# Altium PCB PCB1.PcbDoc (part 2 of 3)
Units mm, origin at the board's own origin, x right, y up, seen from the top; angles counter-clockwise.
Board outline 161.54 x 169.48 mm, 4 copper layers (Top Layer, Layer 1, Layer 2, Bottom Layer), stack 0.603 mm thick; 181 components, 244 nets, 1695 pads, 188 vias.
Unrouted connection lines stored in the file: 630.
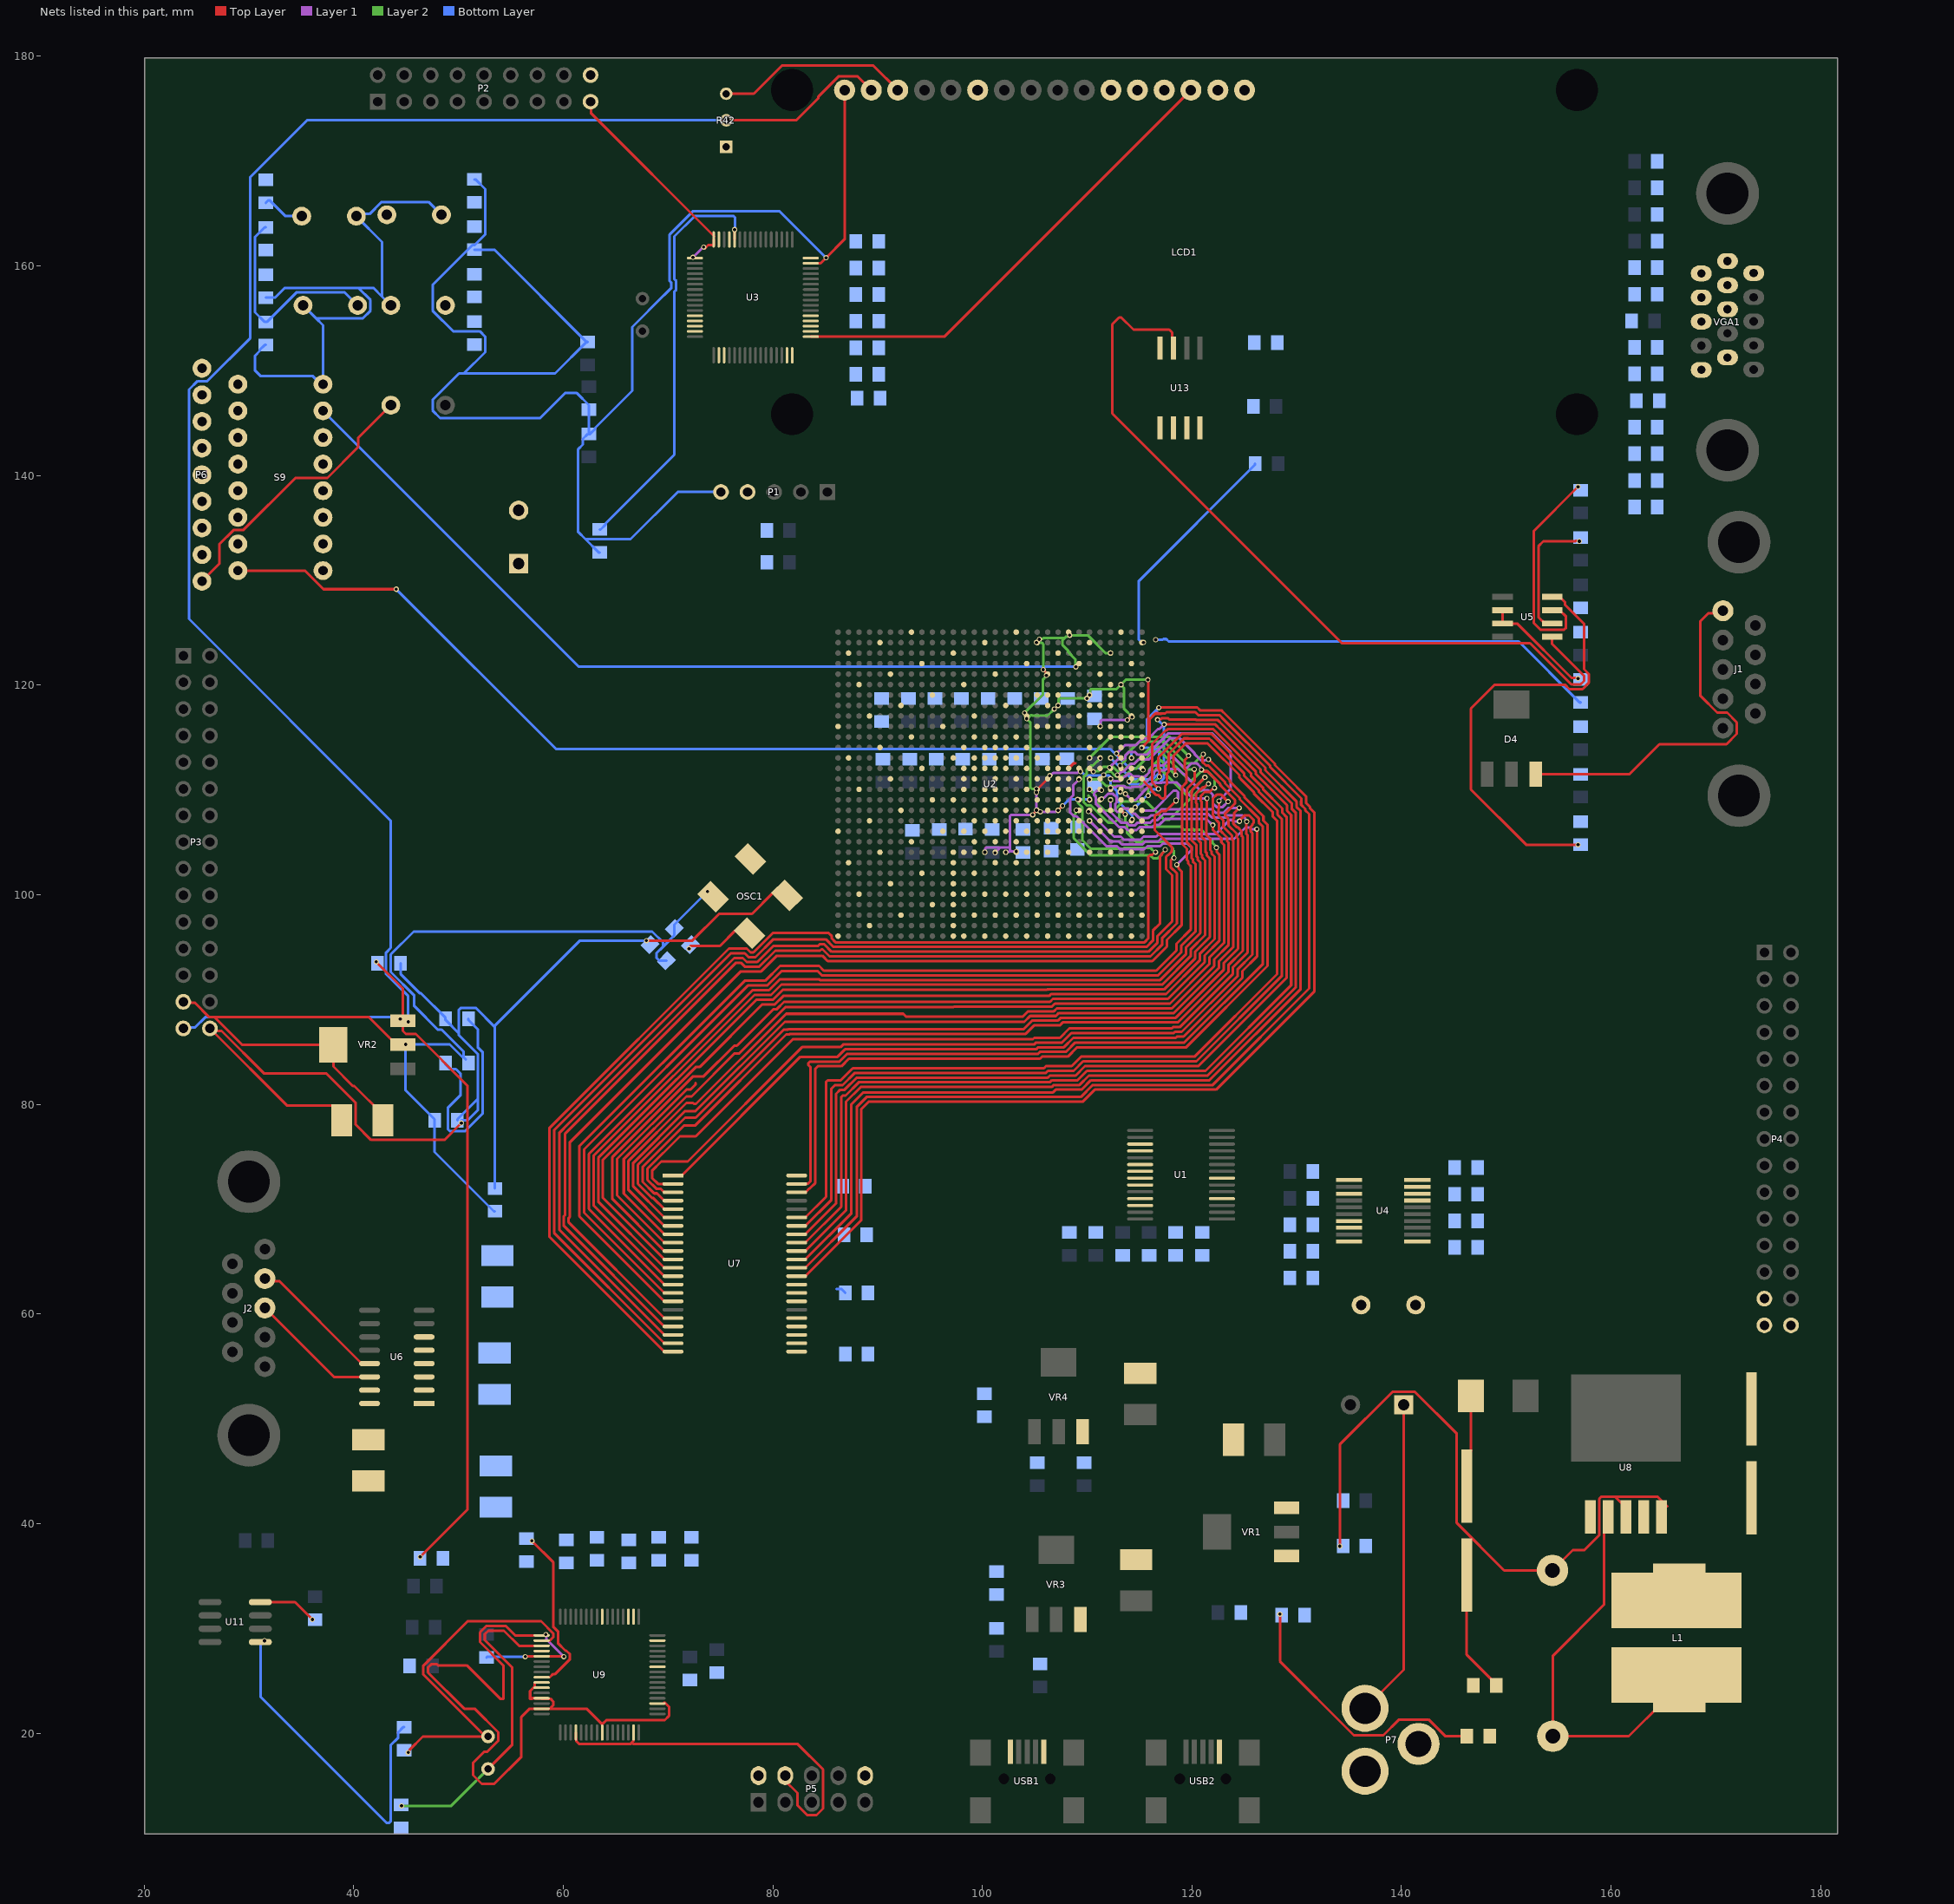
[diagram p4: the nets of this part, all layers, seen from the top]

## Via types
v1: diameter 0.5, hole 0.3, Top Layer to Bottom Layer, 94 vias
v2: diameter 0.5, hole 0.3, Top Layer to Layer 2, 55 vias
v3: diameter 0.5, hole 0.3, Top Layer to Layer 1, 39 vias

## Nets (pads, with @x,y where several pads share a name; then routed paths per layer and width w, separated by ;. In a path a pad name is that pad's centre, name@x,y a point inside that pad or via, vN(x,y) a via of type N, cw(c..) or ccw(c..) an arc to the next point about the centre after c; other vN are vias at no path point) (continued)
3V3: C2.1 C8.2 C13.2 C14.2 C16.2 C17.1 C19.2 C20.2 C21.2 C22.2 C23.2 C24.2 C25.2 C26.2 C28.2 C30.2 C34.2 C35.2 C36.1 C37.1 C47.1 C56.2 D2.1 F1.1 F3.2 F4.1 OSC1.4 P1.4 P2.17 P3.27 P4.27 P5.4 R20.2 R21.2 R25.1 R26.1 R28.1 R31.1 R35.2 R36.2 R37.2 R45.2 R50.2 S1.2 S2.2 S3.2 S4.2 S5.1 S9.9 S9.10 S9.11 S9.12 S9.13 S9.14 S9.15 S9.16 U2.AA16 U2.AA26 U2.AB13 U2.AB23 U2.AC30 U2.AD17 U2.AD27 U2.AE14 U2.AE24 U2.AF21 U2.AG18 U2.AG28 U2.AH15 U2.AH25 U2.AJ12 U2.AJ22 U2.AK19 U2.AK29 U2.R9 U2.T9 U2.U9 U2.V9 U2.W22 U2.Y13 U2.Y15 U2.Y29 U3.1 U3.19 U3.32 U3.48 U3.64 U4.18 U4.19 U4.20 U6.16 U7.11 U7.33 U9.20 U9.31 U9.42 U9.50 U9.56 U13.8 VR2.2 | length 684.6
  Top Layer w0.25: P3.27@23.749,89.789 23.854,89.684 24.874,89.684 26.234,88.324 26.734,88.324 ; C2.1@42.799,78.486 42.799,79.036 40.072,81.763 39.927,81.763 38.075,83.616 VR2.2@38.075,85.691 29.367,85.691 26.734,88.324 ; VR2.2@44.704,85.691 44.104,85.691 41.471,88.324 26.734,88.324 ; U9.20@61.222,20.071 61.222,19.421 61.272,19.371 61.272,19.234 61.536,18.971 66.408,18.971 66.565,19.128 ; P2.17@62.611,175.673 62.671,175.613 62.671,174.548 U3.64@74.405,162.814 ; U9.31@66.722,20.071 66.722,19.284 66.565,19.128 ; U7.11@70.485,65.214 69.66,65.214 63.798,71.076 63.798,74.716 72.648,83.566 73.025,83.566 79.007,89.548 80.206,89.548 81.004,90.345 106.378,90.345 106.555,90.522 117.528,90.522 120.773,93.767 120.773,94.404 122.16,95.791 122.16,103.648 121.886,103.922 121.886,104.141 121.761,104.266 121.761,105.325 121.365,105.721 121.365,107.371 121.415,107.421 121.415,109.171 v3(121.432,109.187) ; v3(73.406,161.798) 73.406,161.755 v3@73.494,161.667 ; v3@73.515,161.689 73.83,162.004 74.355,162.004 U3.64@74.355,162.529 ; P5.4@81.186,15.958 81.186,15.471 82.353,14.304 82.353,13.121 83.281,12.193 84.171,12.193 84.801,12.822 84.801,16.553 82.383,18.971 66.722,18.971 66.565,19.128 ; U7.33@83.11,64.414 88.011,69.315 88.011,79.756 88.958,80.703 109.392,80.703 110.546,81.857 121.989,81.857 131.191,91.059 131.191,107.695 130.821,108.065 130.821,108.192 130.424,108.589 130.424,108.962 130.452,108.99 130.452,109.197 127.461,112.188 127.461,112.318 123.066,116.713 123.063,116.713 122.624,117.152 120.591,117.152 120.319,117.424 117.584,117.424 117.459,117.299 117.096,117.299 117.08,117.282 116.481,117.282 115.955,116.756 115.955,114.784 115.823,114.652 ; v2(104.031,117.356) 104.031,117.31 U2.W22@104.233,117.108 ; v3(104.808,107.637) 105.156,107.985 v3(105.156,108.077) ; v2(105.156,110.109) 105.28,110.109 U2.AA16@106.233,111.062 106.233,111.121 106.427,111.315 v3(106.427,111.374) ; v2(105.808,121.487) U2.AA26@106.16,121.135 ; v3(107.233,108.062) v1(107.658,108.486) ; v2(112.233,123.062) U2.AG28@112.282,123.062 ; v3(113.658,109.637) 113.665,109.63 v3@113.665,109.474 ; v3(113.84,116.683) 113.847,116.683 U2.AJ22@114.138,116.974 ; v1(115.197,114.026) U2.AK19@115.233,114.062 115.823,114.652 ; v2@115.823,120.514 115.823,114.652
  Layer 1 w0.25: v3(72.39,160.829) 72.413,160.829 73.383,161.798 v3(73.406,161.798) ; v3(100.233,104.062) 100.281,104.11 100.281,104.422 100.379,104.521 101.727,104.521 ; v3(101.219,104.013) 101.727,104.521 ; v3(102.233,104.062) 102.281,104.11 102.586,104.11 102.689,104.213 ; v3(103.251,104.14) 102.762,104.14 102.689,104.213 ; v3(104.808,107.637) 102.762,107.637 102.616,107.49 102.616,104.521 ; v3(105.156,108.077) v3(105.156,109.773) ; v3(105.531,107.924) 107.027,107.924 107.165,108.062 v3(107.233,108.062) ; v3(106.427,111.374) 106.495,111.374 106.754,111.633 109.074,111.633 v1@109.172,111.732 ; v3(111.252,116.078) 111.3,116.126 111.3,116.585 111.398,116.683 v3(113.84,116.683) ; v3(113.658,109.637) 114.261,109.034 114.612,109.034 115.246,109.668 115.246,109.707 116.251,110.711 116.638,110.711 116.659,110.689 117.136,110.689 117.158,110.711 118.564,110.711 120.064,109.211 121.408,109.211 v3(121.432,109.187) ; 101.727,104.521 102.616,104.521 ; 102.616,104.521 102.616,104.286 102.689,104.213
  Layer 2 w0.25: v2(104.031,117.356) 105.791,119.116 105.791,120.552 106.11,120.871 v2(106.11,120.939) ; v2(105.156,110.109) 104.732,110.109 104.585,110.255 104.585,116.459 v2(104.235,116.81) 104.302,116.81 104.611,117.119 104.75,117.119 104.768,117.101 106.238,117.101 v2(106.866,117.729) ; v2(105.156,124.079) 105.204,124.031 105.709,124.031 105.808,123.933 v2(105.808,121.487) ; v2(105.433,124.376) 105.481,124.423 105.751,124.423 105.814,124.487 107.845,124.487 ; v2(107.233,118.062) 107.276,118.105 107.276,118.687 107.334,118.745 v2(109.982,118.745) ; v2(108.337,124.769) 108.269,124.769 108.137,124.637 107.995,124.637 107.845,124.487 ; v2@108.404,124.769 110.054,124.769 111.76,123.063 v2(112.233,123.062) v2(112.233,123.062) ; v1@108.901,121.778 108.901,122.442 108.195,123.148 108.195,123.327 108.155,123.327 107.658,123.824 107.658,124.3 107.845,124.487 ; 110.111,109.478 110.188,109.401 110.188,109.141 v1(110.236,109.093) ; v2(110.233,119.062) 110.281,119.11 110.281,119.538 110.379,119.637 112.808,119.637 v2(113.233,120.062) ; v2(114.3,116.967) 113.538,117.729 113.538,119.709 113.233,120.014 v2(113.233,120.062) ; v2(115.796,120.514) 113.685,120.514 v2(113.233,120.062)
  Bottom Layer w0.25: C20.2@31.623,152.467 31.523,152.467 31.048,151.992 31.048,151.892 30.607,151.451 30.607,150.006 31.103,149.51 36.074,149.51 36.867,148.717 S9.16@37.084,148.717 37.084,154.337 36.404,155.017 ; C21.2@31.623,156.985 32.522,156.985 33.454,157.917 40.443,157.917 ; S2.2@35.179,156.242 36.404,155.017 ; S9.15@37.084,146.177 61.508,121.753 v1(108.926,121.753) ; S1.2@43.561,156.242 42.724,157.079 ; S4.2@48.387,164.878 47.162,166.103 42.673,166.103 41.534,164.964 40.472,164.964 S3.2@40.259,164.751 42.724,162.286 42.724,157.079 ; D2.1@50.715,84.284 D2.1@50.477,84.522 ; C47.1@53.492,69.806 53.392,69.806 47.727,75.471 C8.2@47.727,78.486 47.727,78.586 44.958,81.355 v1(44.958,85.725) 49.174,85.725 50.377,84.522 D2.1@50.477,84.522 ; C56.2@69.842,93.698 69.206,93.698 68.892,94.012 68.892,94.42 69.542,95.07 ; v1(73.787,100.33) 70.612,97.155 R50.2@70.612,96.774 70.612,96.14 69.542,95.07 ; 86.09,62.373 86.579,62.373 C35.2@86.919,62.033 ; v1(107.658,108.486) 108.264,109.093 v1(110.236,109.093) ; v1(109.373,111.763) 109.441,111.763 109.825,111.379 112.087,111.379 112.233,111.233 112.233,110.525 112.84,109.918 112.84,109.029 114.3,107.569 v1(114.3,107.188) ; v1(112.242,113.056) 114.3,110.998 116.251,110.998 116.878,111.626 116.878,113.782 116.732,113.928 115.947,113.928 115.849,114.026 v1(115.197,114.026) ; v1(115.385,124.079) 115.189,124.079 114.935,124.333 114.935,129.954 126.035,141.054 R35.2@126.035,141.154 ; v1(116.535,124.333) 117.218,124.333 117.285,124.4 117.542,124.4 117.776,124.166 151.191,124.166 156.999,118.358 R37.2@157.099,118.358 ; 36.404,155.017 40.893,155.017 41.611,155.734 41.611,156.749 40.443,157.917 ; 40.443,157.917 41.886,157.917 42.724,157.079 ; D2.1@50.477,84.522 50.477,85.058 48.397,87.138 48.033,87.138 45.792,89.38 45.792,90.396 43.55,92.637 43.55,94.307 45.73,96.487 68.503,96.487 69.542,95.448 69.542,95.07
  other v1: 113.157,109.834
  other v2: 114.3,107.188
3V3A: C27.1 F1.2 U3.13
5: C31.2 U5.8 | length 42.8
  Top Layer w0.25: U5.8@154.381,128.429 155.092,128.429 155.6,127.922 155.6,127.67 157.42,125.85 157.42,121.525 157.87,121.075 157.87,120.225 157.27,119.625 156.021,119.625 155.627,120.019 148.863,120.019 146.616,117.772 146.616,110.05 151.891,104.775 v1(156.845,104.775)
5V0: C5.2 C7.2 C9.2 C11.2 C53.1 D9.1 F5.2 LCD1.2 LCD1.15 P3.29 P4.29 R42.2 R48.2 R49.1 R51.1 U1.4 U1.20 U11.8 VR1.3 VR2.3 VR3.3 VR4.3 | length 272.7
  Top Layer w0.25: U11.8@31.102,32.517 34.412,32.517 v1(36.068,30.861) ; v1(42.164,93.599) 44.704,91.059 VR2.3@44.704,87.99 44.704,87.015 44.999,86.72 45.934,86.72 50.867,81.787 50.867,41.342 v1(46.355,36.83) ; R42.2@75.565,173.895 82.227,173.895 84.356,176.024 84.356,176.161 86.304,178.109 88.078,178.109 LCD1.2@89.403,176.784 ; v1(128.397,31.369) 128.397,26.869 135.458,19.808 138.273,19.808 139.773,21.308 142.588,21.308 144.154,19.742 D9.1@146.228,19.742
  Bottom Layer w0.25: P3.29@23.749,87.249 23.854,87.354 24.874,87.354 25.844,88.324 44.196,88.324 44.382,88.138 v1(44.45,88.138) ; v1(45.212,87.884) 45.212,90.339 43.1,92.451 43.1,94.493 43.55,94.943 43.55,107.068 24.302,126.316 24.302,148.208 25.11,149.016 26.034,149.016 30.148,153.13 30.148,168.49 35.553,173.895 R42.2@75.565,173.895
A0: U2.AE12 U7.1 | length 94.5
  Top Layer w0.25: U7.1@70.485,73.214 71.31,73.214 82.637,84.541 86.181,84.541 86.901,85.261 105.129,85.261 105.325,85.457 107.782,85.457 108.682,86.357 118.454,86.357 118.569,86.472 119.205,86.472 124.823,92.09 124.823,92.726 126.21,94.113 126.21,106.255 v1(126.196,106.269)
  Layer 1 w0.25: v1(110.236,107.061) 112.204,105.093 113.036,105.093 113.316,104.813 115.284,104.813 115.564,105.093 116.786,105.093 117.029,105.336 124.036,105.336 125.115,106.415 125.473,106.415 125.617,106.271 126.194,106.271 v1(126.196,106.269)
A1: U2.AE13 U7.2 | length 100.3
  Top Layer w0.25: U7.2@70.485,72.414 69.064,72.414 68.486,72.992 68.486,73.676 69.359,74.549 71.882,74.549 82.804,85.471 86.474,85.471 86.714,85.711 104.943,85.711 105.139,85.907 107.596,85.907 108.496,86.807 118.267,86.807 118.383,86.922 119.019,86.922 124.373,92.276 124.373,92.912 125.76,94.3 125.76,105.894 125.621,106.033 125.621,106.509 125.76,106.648 125.76,106.732 125.885,106.857 125.885,107.153 125.473,107.565 124.997,107.565 124.66,107.228 124.66,107.211 124.535,107.087 v1(124.535,107.019)
  Layer 1 w0.25: v1(110.121,107.943) 110.167,107.943 112.567,105.543 113.222,105.543 113.503,105.263 115.097,105.263 115.378,105.543 116.599,105.543 116.842,105.786 122.249,105.786 123.607,107.144 123.853,107.144 123.978,107.019 v1(124.535,107.019)
A2: U2.AG14 U7.3 | length 98.5
  Top Layer w0.25: U7.3@70.485,71.614 69.633,71.614 69.283,71.964 68.878,71.964 68.036,72.806 68.036,73.863 71.135,76.962 72.644,76.962 81.915,86.233 104.829,86.233 104.953,86.357 107.409,86.357 108.309,87.257 118.081,87.257 118.196,87.372 118.833,87.372 123.923,92.462 123.923,93.099 125.31,94.486 125.31,105.707 125.171,105.846 125.171,106.695 125.187,106.711 125.187,106.942 v1(125.235,106.99)
  Layer 1 w0.25: v1(112.233,109.062) 112.233,107.911 113.251,106.893 113.782,106.893 114.062,106.613 114.538,106.613 114.818,106.893 116.04,106.893 116.283,107.136 116.715,107.136 117.284,107.705 121.576,107.705 121.902,107.379 123.206,107.379 123.421,107.594 124.773,107.594 125.11,107.257 125.11,107.182 125.235,107.058 v1(125.235,106.99)
A3: U2.AF14 U7.4 | length 101.6
  Top Layer w0.25: U7.4@70.485,70.814 69.66,70.814 68.96,71.514 68.691,71.514 67.586,72.619 67.586,74.049 71.515,77.978 72.581,77.978 81.275,86.672 81.593,86.672 81.662,86.741 104.14,86.741 104.938,87.539 107.39,87.539 107.673,87.822 118.646,87.822 123.473,92.649 123.473,93.285 124.86,94.672 124.86,105.521 124.721,105.66 124.721,106.093 124.37,106.444 124.297,106.444 123.96,106.781 123.96,107.257 124.028,107.325 124.028,107.808 v1(124.514,108.294)
  Layer 1 w0.25: v1(111.386,109.141) 111.454,109.141 111.579,109.266 111.624,109.266 111.995,109.637 112.471,109.637 112.808,109.3 112.808,108.824 112.683,108.699 112.683,108.097 112.859,107.922 113.066,107.922 113.394,108.25 113.87,108.25 114.357,107.763 114.538,107.763 114.958,107.343 115.854,107.343 116.097,107.586 116.529,107.586 117.098,108.155 121.937,108.155 122.263,107.829 123.019,107.829 123.484,108.294 v1(124.514,108.294)
A4: U2.AG16 U7.5 | length 102.9
  Top Layer w0.25: U7.5@70.485,70.014 69.66,70.014 68.61,71.064 68.505,71.064 67.136,72.433 67.136,74.235 71.641,78.74 72.644,78.74 81.026,87.122 81.407,87.122 81.476,87.191 103.954,87.191 104.752,87.989 107.204,87.989 107.487,88.272 118.46,88.272 123.023,92.835 123.023,93.472 124.41,94.859 124.41,105.335 124.271,105.474 124.271,105.834 123.51,106.594 123.51,106.999 123.465,107.044 123.465,107.266 123.172,107.559 123.172,107.766 124.119,108.713 124.119,109.043 122.961,110.201 122.961,110.204 122.718,110.447 122.718,110.536 121.475,111.779 121.15,111.779 120.987,111.942 v3(120.919,111.942)
  Layer 1 w0.25: v3(112.233,111.062) 112.301,111.062 112.504,110.859 112.762,110.859 113.13,110.859 113.58,111.309 113.672,111.309 113.9,111.537 114.135,111.537 114.362,111.309 114.954,111.309 115.017,111.246 115.493,111.246 115.915,111.668 115.915,111.851 116.395,112.331 117.265,112.331 118.061,113.127 118.268,113.127 119.303,112.093 119.51,112.093 119.973,112.556 120.459,112.556 120.795,112.219 120.795,112.134 120.919,112.01 v3(120.919,111.942)
A5: U2.AD16 U7.18 | length 114.3
  Top Layer w0.25: U7.18@70.485,59.614 69.66,59.614 60.521,68.753 60.521,69.156 60.648,69.283 60.648,76.399 76.947,92.698 78.902,92.698 80.391,94.187 84.728,94.187 85.243,93.672 95.869,93.672 116.223,93.672 117.623,95.072 117.623,95.708 119.01,97.095 119.01,102.234 118.736,102.508 118.736,102.617 118.551,102.802 v3(118.551,102.87)
  Layer 1 w0.25: v3(109.22,110.998) 108.658,110.436 108.658,109.478 108.396,109.216 108.396,107.839 108.732,107.502 108.982,107.502 111.841,104.643 112.85,104.643 113.13,104.363 115.47,104.363 115.75,104.643 116.972,104.643 117.215,104.886 119.581,104.886 119.971,104.497 119.971,104.29 v3(118.551,102.87)
A6: U2.AH13 U7.19 | length 106.2
  Top Layer w0.25: U7.19@70.485,58.814 69.66,58.814 60.071,68.403 60.071,69.342 60.198,69.469 60.198,77.215 61.029,78.046 61.029,78.047 76.501,93.519 76.956,93.519 77.328,93.148 78.715,93.148 80.241,94.673 84.514,94.673 84.641,94.8 84.751,94.8 85.429,94.122 95.682,94.122 116.037,94.122 117.173,95.258 117.173,95.895 118.56,97.282 118.56,102.047 117.976,102.631 117.976,103.325 118.026,103.325 118.225,103.525 v2(118.293,103.525) ; U2.AH13@113.233,108.062 113.239,108.062 113.626,107.675 v2(113.632,107.675)
  Layer 2 w0.25: v2(113.632,107.675) 113.632,107.043 113.792,106.883 113.792,105.937 114.689,105.04 117.591,105.04 118.201,104.43 118.201,104.275 118.293,104.182 v2(118.293,103.525)
A7: U2.AH14 U7.20 | length 111.7
  Top Layer w0.25: U7.20@70.485,58.014 69.66,58.014 59.621,68.053 59.621,77.274 60.579,78.232 60.579,78.233 76.315,93.969 77.143,93.969 77.514,93.598 78.529,93.598 80.054,95.123 84.328,95.123 84.513,95.308 84.88,95.308 85.616,94.572 115.85,94.572 116.723,95.445 116.723,96.081 118.11,97.468 118.11,101.861 117.526,102.445 117.526,103.616 117.672,103.763 117.718,103.763 118.055,104.1 118.055,104.285 118.1,104.329 118.1,104.531 116.459,106.172 116.459,107.526 116.605,107.672 116.791,107.672 117.12,108.001 117.517,108.001 v3(118.482,108.966) ; U2.AH14@113.233,109.062 U2.AH14@113.287,109.116 ; v3(118.482,109.026) 118.491,109.017 v3@118.491,108.966
  Layer 1 w0.25: 115.133,108.036 116.343,108.036 118.235,109.928 118.525,109.928 118.672,109.782 118.672,109.156 v3(118.482,108.966)
A8: U2.AD13 U7.21 | length 113
  Top Layer w0.25: U7.21@70.485,57.214 69.66,57.214 59.124,67.75 59.124,77.538 76.005,94.419 77.329,94.419 77.7,94.048 78.342,94.048 80.053,95.758 85.066,95.758 85.802,95.022 115.664,95.022 116.273,95.631 116.273,96.588 116.967,97.282 116.967,103.695 117.102,103.83 117.102,103.893 117.453,104.244 v2(117.453,104.311)
  Layer 2 w0.25: v2(108.971,108.077) 108.923,108.029 108.923,107.78 108.712,107.569 108.712,105.41 110.363,103.759 116.023,103.759 116.289,103.493 116.765,103.493 117.102,103.83 117.102,103.893 117.453,104.244 v2(117.453,104.311)
A9: U2.AD14 U7.22 | length 112.8
  Top Layer w0.25: U7.22@70.485,56.414 69.66,56.414 58.674,67.4 58.674,77.724 75.819,94.869 77.516,94.869 77.887,94.498 78.156,94.498 80.006,96.347 85.344,96.347 85.643,96.048 85.643,95.818 85.989,95.472 115.477,95.472 115.823,95.818 115.823,103.636 116,103.813 116.204,103.813 116.46,104.068 v2(116.527,104.068)
  Layer 2 w0.25: v2(109.086,109.093) 109.134,109.045 109.134,108.746 109.546,108.334 109.546,105.213 110.364,104.394 113.439,104.394 113.51,104.465 116.062,104.465 116.46,104.068 v2(116.527,104.068)
A10: U2.AF13 U7.23
A11: U2.AB24 U7.24
A12: U2.AA24 U7.25
A13: U2.AA23 U7.26
A14: U2.AA13 U7.27
A15: U2.AH16 U7.42 | length 93.9
  Top Layer w0.25: U7.42@82.285,71.614 83.137,71.614 83.506,71.983 83.542,71.983 84.074,72.516 84.074,83.42 84.295,83.641 86.553,83.641 87.274,84.361 105.502,84.361 105.698,84.557 108.155,84.557 109.055,85.457 119.463,85.457 127.221,93.215 127.221,106.693 126.824,107.091 126.824,107.487 125.019,109.292 125.019,109.416 123.861,110.574 123.861,110.577 123.618,110.82 123.618,110.935 121.635,112.917 v3(121.571,112.917) ; v3(112.892,111.434) 112.892,111.419 113.233,111.077 U2.AH16@113.233,111.062
  Layer 1 w0.25: v3(112.892,111.434) 112.959,111.434 113.284,111.759 113.45,111.759 114.178,112.487 114.471,112.487 114.887,112.903 115.873,112.903 117.905,114.935 118.825,114.935 120.25,113.51 120.25,113.424 120.838,112.837 121.314,112.837 121.346,112.869 121.523,112.869 v3(121.571,112.917)
A16: U2.AH17 U7.43 | length 93.3
  Top Layer w0.25: U7.43@82.285,72.414 82.304,72.433 83.355,72.433 83.61,72.688 83.61,83.539 83.412,83.737 83.412,83.944 83.558,84.091 86.367,84.091 87.087,84.811 105.316,84.811 105.512,85.007 107.969,85.007 108.869,85.907 119.277,85.907 126.771,93.401 126.771,106.507 126.374,106.904 126.374,107.301 124.569,109.106 124.569,109.23 123.411,110.388 123.411,110.39 123.168,110.633 123.168,110.748 121.574,112.342 121.333,112.342 120.996,112.679 120.996,113.155 121.028,113.188 121.028,113.364 v2(121.076,113.412) ; v2(113.147,112.334) 113.19,112.291 113.19,112.105 U2.AH17@113.233,112.062
  Layer 2 w0.25: v2(113.147,112.334) 113.658,112.845 113.658,113.309 114.95,114.601 117.359,114.601 119.404,112.556 120.22,112.556 v2(121.076,113.412)
A17: U2.AF12 U7.44
BLUE0: R4.2 U2.AC16
BLUE1: R3.2 U2.AC17 | length 0.9
  Top Layer w0.25: U2.AC17@108.233,112.062 108.733,112.562 108.899,112.562
BLUE2: R2.2 U2.AB16
BLUE3: R1.2 U2.AB17
BOOT0: R33.1 S5.2 U3.60 | length 39.9
  Top Layer w0.25: U3.60@76.355,162.529 v1(76.355,163.463)
  Bottom Layer w0.25: R33.1@63.475,134.855 63.575,134.855 64.05,135.33 64.05,135.43 70.612,141.992 70.612,157.549 70.784,157.722 70.784,158.571 70.612,158.743 70.612,162.814 72.552,164.754 76.269,164.754 76.415,164.608 76.415,164.099 76.403,164.087 76.403,163.511 v1(76.355,163.463)
"BUT RISE1": C19.1 R23.2 S1.1 U2.AG24
"BUT RISE2": C20.1 R24.2 S2.1 U2.AG25 | length 20.4
  Bottom Layer w0.25: R24.2@31.623,163.687 31.523,163.687 30.598,162.762 30.598,155.576 31.523,154.651 31.723,154.651 34.539,157.467 39.161,157.467 S2.1@40.386,156.242
"BUT RISE3": C21.1 R29.2 S3.1 U3.14 | length 4.2
  Bottom Layer w0.25: R29.2@31.623,166.021 31.879,166.277 31.977,166.277 33.503,164.751 S3.1@35.052,164.751
"BUT RISE4": C22.1 R30.2 S4.1 U3.15
CE: U2.AG17 U7.6 | length 107.1
  Top Layer w0.25: U7.6@70.485,69.214 69.66,69.214 66.686,72.188 66.686,74.422 71.639,79.375 72.643,79.375 81.152,87.884 104.01,87.884 104.565,88.439 107.017,88.439 107.3,88.722 118.273,88.722 122.573,93.022 122.573,93.658 123.96,95.045 123.96,105.148 123.821,105.287 123.821,105.647 123.015,106.454 123.015,107.08 122.532,107.563 122.532,108.209 122.582,108.26 v3(122.582,108.959)
  Layer 1 w0.25: v3(112.141,112.141) 112.912,112.912 113.512,112.912 113.658,113.058 113.658,113.3 113.995,113.637 114.545,113.637 114.829,113.353 115.686,113.353 117.718,115.385 121.959,115.385 123.706,113.638 123.706,110.117 122.582,108.993 v3(122.582,108.959)
D4: LCD1.11 U3.36
D5: LCD1.12 U3.35
D6: LCD1.13 U3.34
D7: LCD1.14 U3.33 | length 46
  Top Layer w0.25: U3.33@83.63,153.254 96.373,153.254 LCD1.14@119.903,176.784
DIN_92: U2.AB22 U4.1
E: LCD1.6 U3.37
FPGA_CLK: U2.AE23 U4.3
FTOU: U2.AF23 U3.61
GND: C1.2 C2.2 C3.2 C4.2 C5.1 C6.1 C7.1 C8.1 C9.1 C10.1 C11.1 C12.1 C13.1 C14.1 C15.1 C16.1 C17.2 C18.2 C23.1 C24.1 C25.1 C26.1 C28.1 C29.1 C30.1 C31.1 C32.1 C33.1 C34.1 C35.1 C36.2 C37.2 C38.2 C39.2 C40.2 C41.2 C42.2 C43.2 C46.2 C47.2 C48.2 C49.1 C50.2 C51.2 C52.1 C53.2 C54.2 C55.1 C56.1 C57.1 C58.1 C59.1 C60.1 C61.1 C62.1 C63.1 C64.1 C65.1 C66.1 C67.1 C68.1 C69.1 C70.1 C71.1 C72.1 C73.1 C74.1 D3.2 D4.3 D8.1 F2.1 J1.5 LCD1.1 LCD1.16 OSC1.2 P1.5 P2.18 P3.30 P4.30 P5.2 P5.10 P6.1 P7.1 R5.1 R6.1 R7.2 R10.2 R13.2 R14.2 R19.2 R23.1 R24.1 R29.1 R30.1 R33.2 R42.1 R47.2 R52.2 S6.1 S7.2 U1.7 U1.18 U1.21 U1.25 U1.26 U2.A1 U2.A11 U2.A21 U2.AA1 U2.AA5 U2.AA10 U2.AA11 U2.AA12 U2.AA21 U2.AB3 U2.AB7 U2.AB11 U2.AB18 U2.AB28 U2.AC1 U2.AC5 U2.AC9 U2.AC11 U2.AC15 U2.AC25 U2.AD3 U2.AD7 U2.AD11 U2.AD12 U2.AD22 U2.AE1 U2.AE5 U2.AE9 U2.AE11 U2.AE19 U2.AE29 U2.AF3 U2.AF7 U2.AF11 U2.AF16 U2.AF26 U2.AG1 U2.AG5 U2.AG9 U2.AG11 U2.AG13 U2.AG23 U2.AH3 U2.AH7 U2.AH11 U2.AH20 U2.AH30 U2.AJ1 U2.AJ5 U2.AJ9 U2.AJ11 U2.AJ17 U2.AJ27 U2.AK3 U2.AK7 U2.AK11 U2.AK14 U2.AK24 U2.B8 U2.B18 U2.B28 U2.C5 U2.C15 U2.C25 U2.D2 U2.D12 U2.D22 U2.E9 U2.E19 U2.E29 U2.F6 U2.F16 U2.F26 U2.G3 U2.G13 U2.G23 U2.H10 U2.H20 U2.H30 U2.J7 U2.J17 U2.J27 U2.K4 U2.K14 U2.K24 U2.L11 U2.L21 U2.M1 U2.M2 U2.M3 U2.M4 U2.M5 U2.M6 U2.M7 U2.M8 U2.M9 U2.M14 U2.M18 U2.M28 U2.N1 U2.N5 U2.N9 U2.N11 U2.N13 U2.N15 U2.N17 U2.N19 U2.N25 U2.P3 U2.P7 U2.P9 U2.P12 U2.P16 U2.P18 U2.P20 U2.P22 U2.R1 U2.R5 U2.R11 U2.R13 U2.R14 U2.R15 U2.R17 U2.R19 U2.R29 U2.T3 U2.T8 U2.T10 U2.T12 U2.T14 U2.T15 U2.T16 U2.T18 U2.T20 U2.T26 U2.U1 U2.U5 U2.U11 U2.U13 U2.U17 U2.U19 U2.U23 U2.V3 U2.V8 U2.V12 U2.V14 U2.V16 U2.V18 U2.V20 U2.V30 U2.W1 U2.W5 U2.W11 U2.W13 U2.W15 U2.W17 U2.W19 U2.W27 U2.Y3 U2.Y7 U2.Y14 U2.Y16 U2.Y18 U2.Y24 U3.12 U3.18 U3.31 U3.47 U3.63 U4.11 U5.5 U6.15 U7.12 U7.34 U8.3 U8.5 U9.1 U9.5 U9.10 U9.11 U9.13 U9.15 U9.25 U9.35 U9.47 U9.51 U11.5 U13.1 U13.2 U13.3 U13.4 U13.7 USB1.5 USB2.5 VGA1.5 VGA1.6 VGA1.7 VGA1.8 VGA1.10 VGA1.11 VR1.1 | length 836.9
  Top Layer w0.25: P6.1@25.527,129.921 27.181,131.575 27.181,133.434 28.539,134.792 29.463,134.792 34.453,139.782 37.501,139.782 40.428,142.709 40.428,143.584 S6.1@43.561,146.717 ; P3.30@26.289,87.249 P3.30@26.528,87.01 ; C2.2@38.862,78.486 38.862,79.036 37.987,79.911 33.627,79.911 P3.30@26.528,87.01 ; v1(50.292,78.232) 48.671,76.611 41.664,76.611 40.187,78.088 40.187,80.171 37.411,82.947 31.475,82.947 27.412,87.01 P3.30@26.528,87.01 ; v1(56.388,27.305) 56.429,27.346 U9.5@57.947,27.346 60.03,27.346 v3(60.071,27.305) ; U9.13@57.947,23.296 58.783,23.296 59.047,23.032 59.047,22.659 58.783,22.396 ; U9.13@57.947,23.346 57.083,23.346 57.033,23.296 56.847,23.296 56.847,24.032 57.297,24.482 57.297,24.846 U9.10@57.947,24.846 ; U9.1@57.947,29.346 55.424,29.346 54.535,30.235 52.661,30.235 52.061,29.635 52.061,28.698 54.287,26.472 54.287,23.296 53.991,23.296 50.802,26.485 48.046,26.485 47.921,26.61 47.445,26.61 47.108,26.273 47.108,25.797 50.559,22.346 51.555,22.346 53.807,20.094 53.807,19.286 52.754,18.233 52.46,18.233 51.407,17.18 51.407,16 52.242,15.165 53.422,15.165 56.015,17.757 56.015,21.564 56.797,22.346 U9.15@57.947,22.346 62.233,22.346 63.722,20.857 64.123,21.258 69.696,21.258 70.097,21.659 70.097,22.532 69.733,22.896 U9.35@69.596,22.896 ; v1(67.945,95.631) 72.331,95.631 74.889,98.188 78.028,98.188 80.023,100.183 81.119,100.183 OSC1.2@81.366,99.935 ; U7.12@70.485,64.414 69.66,64.414 63.348,70.726 63.348,74.902 78.444,89.998 80.02,89.998 80.954,90.932 106.172,90.932 106.212,90.972 117.341,90.972 120.323,93.954 120.323,94.59 121.71,95.977 121.71,103.461 121.436,103.735 121.436,103.954 121.311,104.079 121.311,105.138 120.915,105.534 120.915,108.891 120.857,108.949 120.857,109.426 120.928,109.497 120.928,109.513 121.219,109.805 121.693,109.805 122.089,110.2 v2(122.157,110.2) ; U7.34@82.285,65.214 83.11,65.214 87.503,69.607 87.503,80.01 88.646,81.153 106.749,81.153 107.003,81.407 109.46,81.407 110.36,82.307 121.68,82.307 130.371,90.998 130.371,107.998 129.974,108.395 129.974,108.916 127.011,111.879 127.011,112.131 122.879,116.263 122.877,116.263 122.438,116.702 120.404,116.702 120.382,116.724 117.844,116.724 117.719,116.849 117.283,116.849 117.266,116.832 117.107,116.832 117.029,116.755 116.767,116.755 v1(116.72,116.707) ; U3.47@83.63,160.254 84.562,160.254 v1(85.09,160.782) 86.853,162.545 LCD1.1@86.853,176.784 ; U13.7@118.237,152.174 118.112,152.299 118.112,153.649 117.837,153.924 114.427,153.924 113.261,155.09 113.053,155.09 112.395,154.432 112.395,145.923 134.304,124.014 152.269,124.014 156.208,120.075 157.083,120.075 157.42,120.412 157.42,120.888 154.381,123.927 U5.5@154.381,124.619 ; v1(134.112,37.846) 134.112,47.553 139.148,52.59 141.268,52.59 145.268,48.589 145.268,40.068 149.795,35.541 D8.1@154.407,35.541 156.352,37.487 157.448,37.487 158.867,38.906 158.867,42.375 159.057,42.566 160.377,42.566 ; C51.2@146.228,35.109 146.228,27.488 149.047,24.668 R52.2@149.047,24.568 ; D4.3@152.795,111.512 161.757,111.512 164.614,114.369 171.014,114.369 171.999,115.354 171.999,116.452 171.073,117.378 170.125,117.378 168.529,118.974 168.529,126.111 169.299,126.881 170.452,126.881 J1.5@170.674,127.103 ; U8.3@161.417,40.641 161.417,40.721 161.817,41.121 161.822,41.121 160.377,42.566 ; U8.5@164.817,40.641 164.817,41.256 165.217,41.656 165.354,41.656 164.444,42.566 160.377,42.566
  Layer 1 w0.25: v3(58.345,29.421) 58.393,29.373 58.393,28.983 v3(60.071,27.305)
  Layer 2 w0.25: v2(111.574,111.434) 111.899,111.759 112.272,111.759 112.722,111.309 113.571,111.309 114.3,112.037 114.658,112.037 116.286,113.665 117.022,113.665 119.78,110.908 119.987,110.908 120.858,111.779 121.475,111.779 122.157,111.098 v2(122.157,110.2)
  Bottom Layer w0.25: v1(31.496,28.829) 31.115,28.448 31.115,23.495 43.173,11.437 43.38,11.437 43.527,11.583 43.527,18.85 44.256,19.579 44.256,20.104 44.731,20.579 C49.1@44.831,20.579 ; C7.1@44.475,93.472 44.475,92.456 46.334,90.597 46.434,90.597 48.768,88.263 R14.2@48.768,88.163 48.768,88.063 50.027,86.804 ; C8.1@49.911,78.486 49.911,78.586 51.877,80.552 ; C8.1@50.292,78.486 50.886,78.486 51.877,79.477 51.877,80.552 ; R23.1@51.537,161.554 53.424,161.554 C29.1@62.232,152.746 ; R30.1@51.537,168.256 51.637,168.256 52.562,167.331 52.562,163.003 51.562,162.004 51.35,162.004 47.543,158.196 47.543,155.734 49.5,153.777 52.037,153.777 52.562,153.252 52.562,151.783 50.526,149.748 ; R47.2@52.68,27.234 52.751,27.305 v1(56.388,27.305) ; C47.2@53.492,71.99 53.492,87.383 53.42,87.456 ; C29.1@62.332,152.746 C29.1@62.232,152.746 ; R33.2@63.475,132.671 63.375,132.671 62.115,133.93 ; v1(67.945,95.631) 61.595,95.631 53.42,87.456 ; P1.5@75.057,138.43 70.929,138.43 66.429,133.93 62.115,133.93 ; v1(85.09,160.782) 80.668,165.204 72.366,165.204 70.162,163 70.162,158.557 70.334,158.384 70.334,157.908 69.68,157.254 69.662,157.254 66.589,154.181 66.589,148.095 63.034,144.539 63.034,144.439 62.559,143.964 C15.1@62.459,143.964 ; 113.889,110.772 114.114,110.548 116.437,110.548 116.571,110.682 116.887,110.682 117.328,111.123 117.328,116.099 v1(116.72,116.707) ; 50.027,86.804 50.027,88.998 50.218,89.188 51.687,89.188 53.42,87.456 ; 50.027,86.804 50.027,86.632 51.877,84.782 51.877,80.552 ; 50.526,149.748 59.233,149.748 C29.1@62.232,152.746 ; 50.526,149.748 50.066,149.748 47.543,147.224 47.543,146.209 48.261,145.492 57.798,145.492 60.181,147.875 61.307,147.875 62.459,146.723 C18.2@62.459,146.298 C15.1@62.459,143.964 ; 62.115,133.93 61.434,134.612 61.434,142.514 61.884,142.964 61.884,143.489 62.359,143.964 C15.1@62.459,143.964
GNDA: C27.2 F2.2
GREEN0: R12.2 U2.AC12
GREEN1: R11.2 U2.AB12
GREEN2: R9.2 U2.AB14
GREEN3: R8.2 U2.AB15
HSYNC: R7.1 U2.AH19
I/O_P79_GCLK0: OSC1.3 U2.Y21
INIT_B: R28.2 U2.AB21 U2.W9 U4.8
IO0: U2.AG15 U7.7 | length 105.8
  Top Layer w0.25: U7.7@70.485,68.414 69.66,68.414 66.236,71.838 66.236,74.608 71.765,80.137 72.39,80.137 72.476,80.051 72.683,80.051 81.277,88.646 92.456,88.646 92.709,88.393 103.883,88.393 104.379,88.889 106.831,88.889 107.114,89.172 118.087,89.172 122.123,93.208 122.123,93.844 123.51,95.231 123.51,104.962 123.371,105.101 123.371,105.461 122.565,106.267 122.565,106.893 122.082,107.376 122.082,107.521 122.007,107.596 122.007,109.198 122.361,109.551 122.803,109.551 123.14,109.214 123.14,109.172 123.414,108.898 v3(123.451,108.898)
  Layer 1 w0.25: v3(112.233,110.212) 112.281,110.26 112.77,110.26 112.919,110.409 113.495,110.409 113.661,110.243 114.195,110.243 114.263,110.311 115.194,110.311 116.365,111.482 116.365,111.665 116.581,111.881 117.451,111.881 117.557,111.987 118.7,111.987 119.184,111.504 119.255,111.504 120.786,109.973 121.566,109.973 122.007,109.533 122.007,108.721 122.344,108.384 122.938,108.384 v3(123.451,108.898)
IO1: U2.AF15 U7.8 | length 102.3
  Top Layer w0.25: U7.8@70.485,67.614 69.66,67.614 65.786,71.488 65.786,74.795 71.763,80.772 72.263,80.772 76.364,84.873 76.808,84.873 81.217,89.281 97.272,89.281 97.33,89.339 106.644,89.339 106.927,89.622 117.901,89.622 121.673,93.394 121.673,94.031 123.06,95.418 123.06,104.767 122.809,105.018 122.809,105.387 121.99,106.206 v3(121.99,106.655)
  Layer 1 w0.25: v3(111.379,109.982) 111.331,109.934 110.918,109.934 110.667,109.683 110.667,109.475 110.811,109.331 110.811,108.721 111.812,107.72 111.812,107.695 113.064,106.443 113.595,106.443 113.875,106.163 114.725,106.163 115.005,106.443 116.226,106.443 116.47,106.686 116.902,106.686 117.47,107.255 121.39,107.255 v3(121.99,106.655)
  other v2: 121.99,106.655
IO2: U2.AF17 U7.9 | length 21.2
  Top Layer w0.25: U7.9@70.485,66.814 69.66,66.814 65.151,71.323 65.151,74.796 71.762,81.407 72.136,81.407 72.644,81.915 72.644,82.042
IO3: U2.AF18 U7.10 | length 108.9
  Top Layer w0.25: U7.10@70.485,66.014 69.66,66.014 64.701,70.973 64.701,74.982 72.396,82.677 73.406,82.677 76.327,85.598 76.581,85.598 80.081,89.098 80.393,89.098 81.084,89.789 106.458,89.789 106.741,90.072 117.714,90.072 121.223,93.581 121.223,94.217 122.61,95.604 122.61,103.834 122.384,104.06 122.384,104.456 v2(122.336,104.504)
  Layer 2 w0.25: v2(111.252,113.03) 110.544,112.322 110.353,112.322 109.948,111.917 109.948,111.525 109.658,111.235 109.658,109.481 109.661,109.478 109.661,108.855 109.998,108.518 110.377,108.518 112.016,106.879 112.596,106.879 113.057,107.341 113.057,107.585 113.057,107.913 113.394,108.25 113.87,108.25 114.357,107.763 114.538,107.763 115.817,106.484 118.931,106.484 119.212,106.204 120.005,106.204 120.071,106.27 120.124,106.27 120.243,106.151 120.298,106.206 120.928,106.206 121.712,105.422 121.953,105.181 121.953,104.954 122.336,104.571 v2(122.336,104.504)
IO4: U2.AE15 U7.13 | length 113
  Top Layer w0.25: U7.13@70.485,63.614 69.66,63.614 62.898,70.376 62.898,75.089 78.257,90.448 79.834,90.448 80.826,91.44 84.293,91.44 84.311,91.422 96.801,91.422 117.155,91.422 119.873,94.14 119.873,94.776 121.26,96.163 121.26,103.275 120.986,103.549 120.986,103.768 120.861,103.893 120.861,104.952 120.465,105.348 120.465,108.705 120.407,108.763 120.407,109.612 120.478,109.683 120.478,109.7 121.033,110.255 121.171,110.255 121.509,110.592 v2(121.576,110.592)
  Layer 2 w0.25: v2(110.233,110.062) 110.811,109.484 110.811,108.903 111.678,108.035 112.543,108.035 113.401,108.894 114.307,108.894 114.342,108.928 114.818,108.928 114.853,108.894 115.642,108.894 117.38,107.156 117.825,107.156 120.573,109.904 120.889,109.904 v2(121.576,110.592)
IO5: U2.AE16 U7.14 | length 113.5
  Top Layer w0.25: U7.14@70.485,62.814 70.452,62.847 69.627,62.847 62.448,70.026 62.448,75.275 78.071,90.898 79.647,90.898 80.699,91.949 84.42,91.949 84.497,91.872 96.614,91.872 116.969,91.872 119.423,94.326 119.423,94.963 120.81,96.35 120.81,103.089 120.536,103.363 120.536,103.581 120.411,103.706 120.411,104.766 119.957,105.22 119.957,109.798 120.028,109.869 120.028,109.995 v2(121.237,111.204)
  Layer 2 w0.25: v2(110.236,110.998) 111.197,110.998 111.786,110.409 113.395,110.409 113.493,110.311 113.694,110.311 113.759,110.246 114.198,110.246 114.263,110.311 114.884,110.311 115.37,110.796 115.679,110.796 116.365,111.482 116.365,111.792 116.674,112.1 116.881,112.1 119.403,109.578 119.611,109.578 v2(121.237,111.204)
IO6: U2.AE17 U7.15 | length 113.9
  Top Layer w0.25: U7.15@70.485,62.014 69.66,62.014 61.998,69.676 61.998,75.714 77.632,91.348 79.461,91.348 80.823,92.71 84.296,92.71 84.684,92.322 96.428,92.322 116.782,92.322 118.973,94.513 118.973,95.149 120.36,96.536 120.36,102.902 120.086,103.176 120.086,103.395 119.961,103.52 119.961,104.579 119.507,105.033 119.507,109.985 119.578,110.056 119.578,110.181 120.269,110.872 120.269,111.365 ; U2.AE17@110.233,112.062 110.255,112.062 110.569,111.747 v2(110.591,111.747) ; v2(120.22,111.981) 120.268,111.933 120.268,111.366
  Layer 2 w0.25: v2(110.591,111.747) 110.639,111.795 111.122,111.795 111.536,112.209 112.459,112.209 112.909,111.759 113.385,111.759 114.113,112.487 114.471,112.487 115.184,113.199 116.099,114.115 117.209,114.115 117.602,113.722 119.342,111.981 v2(120.22,111.981)
IO7: U2.AE18 U7.16 | length 115
  Top Layer w0.25: U7.16@70.485,61.214 69.66,61.214 61.548,69.326 61.548,76.026 77.32,91.798 79.274,91.798 80.695,93.218 84.424,93.218 84.87,92.772 96.241,92.772 116.596,92.772 118.523,94.699 118.523,95.336 119.91,96.723 119.91,102.716 119.636,102.99 119.636,103.209 119.511,103.334 119.511,104.393 119.057,104.847 119.057,110.297 119.497,110.737 119.497,111.841 119.315,112.023 119.315,112.843 119.675,113.204 v2(119.675,113.272)
  Layer 2 w0.25: v2(110.233,113.062) 112.222,115.051 117.896,115.051 v2(119.675,113.272)
IO8: U2.AA17 U7.29
IO9: U2.AK12 U7.30
IO10: U2.AK13 U7.31
IO11: U2.AJ18 U7.32 | length 109.8
  Top Layer w0.25: U7.32@82.285,63.614 83.11,63.614 88.461,68.965 88.461,79.57 89.144,80.253 109.578,80.253 110.732,81.407 122.301,81.407 131.699,90.805 131.699,107.823 131.271,108.251 131.271,108.378 130.902,108.747 130.902,109.384 129.033,111.253 127.911,112.374 127.911,112.504 123.028,117.387 123.026,117.387 122.81,117.602 120.777,117.602 120.505,117.874 116.857,117.874 v1(116.84,117.857)
  Layer 1 w0.25: 116.585,117.386 116.733,117.386
  Bottom Layer w0.25: v1(114.233,113.062) 114.233,113.875 114.959,114.601 115.551,114.601 115.697,114.747 115.697,116.714 v1(116.84,117.857)
IO12: U2.AH18 U7.35 | length 103.5
  Top Layer w0.25: U7.35@82.285,66.014 83.11,66.014 86.995,69.899 86.995,80.264 88.392,81.661 106.621,81.661 106.817,81.857 109.273,81.857 110.173,82.757 121.493,82.757 129.921,91.185 129.921,107.812 129.524,108.209 129.524,108.73 126.561,111.692 126.561,111.945 122.693,115.813 122.67,115.813 122.231,116.252 120.218,116.252 120.196,116.274 117.361,116.274 v3(117.35,116.262) ; v3(112.808,113.487) U2.AH18@113.233,113.062
  Layer 1 w0.25: v3@112.85,113.56 112.881,113.56 113.612,114.291 114.649,114.291 115.131,114.774 115.188,114.774 115.354,114.939 115.888,114.939 116.755,115.806 116.88,115.806 117.336,116.262 v3(117.35,116.262)
IO13: U2.AJ13 U7.36 | length 105.4
  Top Layer w0.25: U7.36@82.285,66.814 83.11,66.814 86.532,70.236 86.532,80.708 86.678,80.854 86.949,80.854 88.206,82.111 106.434,82.111 106.63,82.307 109.087,82.307 109.987,83.207 121.307,83.207 129.471,91.371 129.471,107.625 129.074,108.023 129.074,108.543 126.111,111.506 126.111,111.736 123.824,114.022 122.045,115.802 120.031,115.802 120.009,115.824 117.725,115.824 117.588,115.687 117.495,115.687 116.205,114.398 116.205,110.726 116.809,110.122 v1(116.809,110.107) ; U2.AJ13@114.233,108.062 114.261,108.062 114.552,108.353 v1(114.58,108.353)
  Bottom Layer w0.25: v1(114.58,108.353) 116.286,110.059 116.761,110.059 v1(116.809,110.107)
IO14: U2.AJ14 U7.37 | length 99.4
  Top Layer w0.25: U7.37@82.285,67.614 83.11,67.614 86.048,70.552 86.048,81.007 86.437,81.396 86.854,81.396 88.019,82.561 106.248,82.561 106.444,82.757 108.901,82.757 109.801,83.657 120.617,83.657 129.021,92.061 129.021,107.439 128.624,107.836 128.624,108.233 126.819,110.038 126.819,110.162 125.661,111.32 125.661,111.549 121.858,115.352 119.845,115.352 119.823,115.374 119.056,115.374 116.78,113.098 116.78,112.036 116.898,111.919 v2(116.898,111.264)
  Layer 2 w0.25: v2(115.821,109.469) 115.821,110.161 116.247,110.586 116.247,110.689 116.33,110.772 116.405,110.772 v2(116.898,111.264)
IO15: U2.AK16 U7.38 | length 99.9
  Top Layer w0.25: U7.38@82.285,68.414 83.11,68.414 85.598,70.902 85.598,81.515 85.929,81.846 86.668,81.846 87.833,83.011 106.061,83.011 106.257,83.207 108.714,83.207 109.614,84.107 120.43,84.107 128.571,92.248 128.571,107.252 128.174,107.65 128.174,108.046 126.369,109.851 126.369,109.975 125.211,111.133 125.211,111.136 124.968,111.379 124.968,111.606 121.906,114.667 121.672,114.902 119.659,114.902 119.637,114.924 119.242,114.924 117.778,113.46 117.778,111.727 117.613,111.562 117.613,110.554 117.457,110.398 117.457,109.338 117.311,109.192 117.103,109.192 116.761,109.534 116.569,109.534 116.138,109.965 116.138,110.157 115.999,110.296 115.922,110.296 115.503,110.715 ; U2.AK16@115.233,111.062 115.233,110.986 115.503,110.716
K_1: P6.9 S9.1 U2.AH21
K_2: P6.8 S9.2 U2.AG21
K_3: P6.7 S9.3 U2.AG20
K_4: P6.6 S9.4 U2.AF20
K_5: P6.5 S9.5 U2.AK20
K_6: P6.4 S9.6 U2.AJ20
K_7: P6.3 S9.7 U2.AK18
K_8: P6.2 S9.8 U2.AK17 | length 94.3
  Top Layer w0.25: S9.8@28.956,130.937 35.352,130.937 37.13,129.159 v1(44.069,129.159)
  Bottom Layer w0.25: v1(44.069,129.159) 59.324,113.904 112.207,113.904 114.028,112.083 115.096,112.083 115.273,111.907 v1(115.34,111.907)
LB: U2.AJ16 U7.39 | length 98.8
  Top Layer w0.25: U7.39@82.285,69.214 83.11,69.214 85.09,71.194 85.09,82.15 85.236,82.296 86.481,82.296 87.646,83.461 105.875,83.461 106.071,83.657 108.528,83.657 109.428,84.557 120.244,84.557 128.121,92.434 128.121,107.066 127.724,107.463 127.724,107.86 125.919,109.665 125.919,109.789 124.761,110.947 124.761,110.95 124.518,111.193 124.518,111.42 121.72,114.217 121.486,114.452 119.406,114.452 118.228,113.274 118.228,112.162 118.414,111.976 118.414,111.46 v2(118.462,111.412) ; v2(113.997,110.821) 113.997,110.824 114.233,111.059 U2.AJ16@114.233,111.062
  Layer 2 w0.25: v2(113.997,110.821) 114.02,110.798 114.735,110.798 115.183,111.246 115.493,111.246 115.915,111.668 115.915,111.978 116.759,112.822 117.052,112.822 v2(118.462,111.412)
NetC38_1: C38.1 C39.1 F3.1 U9.9 | length 16.3
  Top Layer w0.25: v1(57.023,38.354) 59.047,36.33 59.047,30.169 59.497,29.719 59.497,28.6 60.217,27.88 60.309,27.88 60.646,27.543 60.646,27.067 59.239,25.659 59.047,25.659 58.733,25.346 U9.9@57.947,25.346
NetC42_1: C42.1 C43.1 F4.2 U9.4
NetC44_1: C44.1 U6.4
NetC44_2: C44.2 U6.5
NetC45_1: C45.1 U6.1
NetC45_2: C45.2 U6.3
NetC46_1: C46.1 U6.2
NetC48_1: C48.1 U6.6
NetC49_2: C49.2 U9.2 Y2.1 | length 33.8
  Top Layer w0.25: v1(45.212,18.161) 45.212,18.229 45.339,18.356 45.339,18.415 46.614,19.69 Y2.1@52.579,19.69 ; Y2.1@52.832,19.69 Y2.1@52.579,19.69 ; U9.2@57.947,28.846 58.733,28.846 59.047,29.159 59.047,29.532 57.894,30.685 50.883,30.685 46.658,26.46 46.658,25.61 Y2.1@52.579,19.69
NetC50_1: C50.1 U9.3 Y2.2 | length 30.8
  Top Layer w0.25: Y2.2@52.832,16.59 55.115,18.873 55.115,26.3 52.511,28.904 52.511,29.448 52.848,29.785 54.348,29.785 55.787,28.346 U9.3@57.947,28.346
  Layer 2 w0.25: v1(44.577,13.081) 49.323,13.081 Y2.2@52.832,16.59
NetC51_1: C51.1 D5.2 U8.1 | length 8.8
  Top Layer w0.25: C51.1@146.228,43.567 146.228,46.567 146.634,46.974 D5.2@146.634,52.203
NetC54_1: C54.1 U1.17
NetC55_2: C55.2 L1.2 U8.4
NetC74_2: C74.2 U2.N16 U2.P17 U2.R18 U2.T17 U2.T19 U2.U18
NetD1_2: D1.2 R13.1
NetD2_2: D2.2 R14.1 | length 21.4
  Bottom Layer w0.25: D2.2@48.768,83.947 48.768,83.847 49.243,83.372 49.768,83.372 50.218,82.922 50.218,80.903 48.986,79.671 48.986,77.651 49.176,77.461 50.646,77.461 52.327,79.143 52.327,84.968 51.877,85.418 51.877,87.138 50.952,88.063 R14.1@50.952,88.163
NetD3_1: D3.1 R27.1
NetD6_2: D6.2 U1.23
NetD7_2: D7.2 U1.22
NetD8_2: D8.2 L1.1 U8.2 | length 36.5
  Top Layer w0.25: U8.2@159.717,40.641 159.317,40.241 159.317,32.256 154.432,27.371 D8.2@154.432,19.717 161.695,19.717 164.997,23.019 L1.1@166.497,23.019
NetD9_2: D9.2 R52.1
NetF5_1: F5.1 USB1.1
NetJ2_2: J2.2 U6.13 | length 13.4
  Top Layer w0.25: J2.2@31.535,63.388 31.777,63.146 32.91,63.146 40.779,55.277 U6.13@41.529,55.277
NetJ2_3: J2.3 U6.14 | length 12.7
  Top Layer w0.25: J2.3@31.535,60.588 38.116,54.007 U6.14@41.529,54.007
NetLCD1_3: LCD1.3 R42.3 | length 18.4
  Top Layer w0.25: R42.3@75.565,176.435 78.191,176.435 80.865,179.109 89.603,179.109 LCD1.3@91.928,176.784
NetOSC1_1: OSC1.1 R50.1 | length 6.6
  Top Layer w0.25: v1(72.009,94.869) 72.009,94.937 72.155,95.083 72.155,95.123 74.963,95.123 76.43,96.591 77.526,96.591 OSC1.1@77.774,96.343
NetP7_2: P7.2 S8.1 | length 30.5
  Top Layer w0.25: P7.2@136.525,22.383 140.208,26.066 S8.1@140.208,51.34
NetR1_1: R1.1 R2.1 R3.1 R4.1 VGA1.3
NetR8_1: R8.1 R9.1 R11.1 R12.1 VGA1.2
NetR15_1: R15.1 R16.1 R17.1 R18.1 VGA1.1
NetR22_1: R22.1 U2.P10
NetR22_2: R22.2 U4.17
NetR25_2: R25.2 R27.2 U2.AA9 U4.10
NetR26_2: R26.2 S7.1 U2.Y9 U4.7
NetR32_1: R32.1 U2.Y12
NetR34_1: R34.1 U2.V10
NetR37_1: R37.1 U5.2 U5.3 | length 10.6
  Top Layer w0.25: U5.2@149.657,127.159 U5.3@149.657,125.889 151.031,125.889 156.221,120.698 156.797,120.698 v1(156.845,120.65)
NetR38_1: R38.1 R39.2
NetR40_1: R40.1 U5.6 | length 12.4
  Top Layer w0.25: U5.6@154.381,125.889 153.67,125.889 153.066,126.493 153.066,133.254 153.543,133.731 156.591,133.731 156.614,133.754 156.949,133.754 v1(156.972,133.731)
NetR41_1: R41.1 U5.7 | length 20.8
  Top Layer w0.25: U5.7@154.381,127.159 155.092,127.159 155.697,126.554 155.697,125.475 155.506,125.284 153.256,125.284 152.616,125.925 152.616,134.709 v1(156.845,138.938)